# Altium PCB PCB_Gemas.PcbDoc (part 1 of 2)
Units mm, origin at the board's own origin, x right, y up, seen from the top; angles counter-clockwise.
Board outline 100 x 71 mm, 2 copper layers (Top Layer, Bottom Layer); 85 components, 61 nets, 758 pads, 66 vias.
Unrouted connection lines stored in the file: 1.
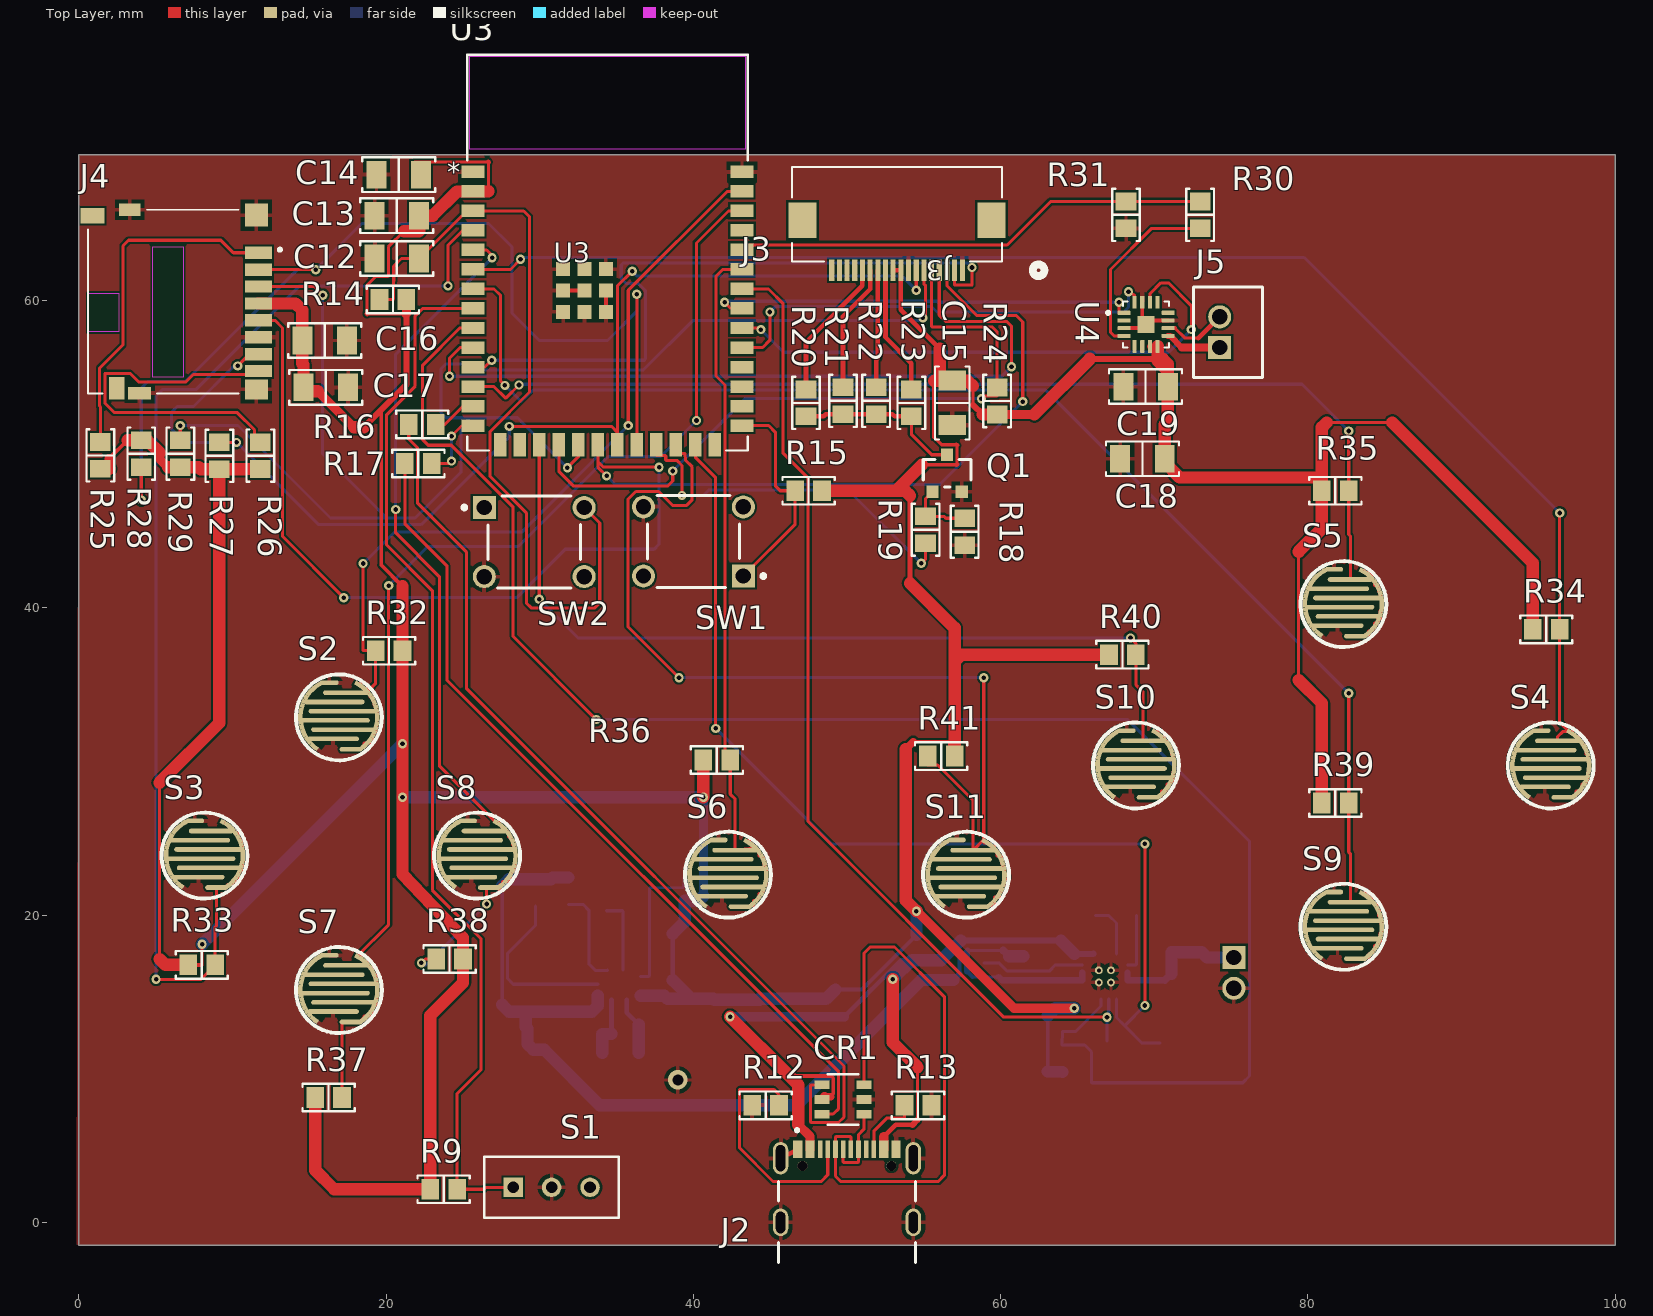
[diagram p0: Top Layer view]
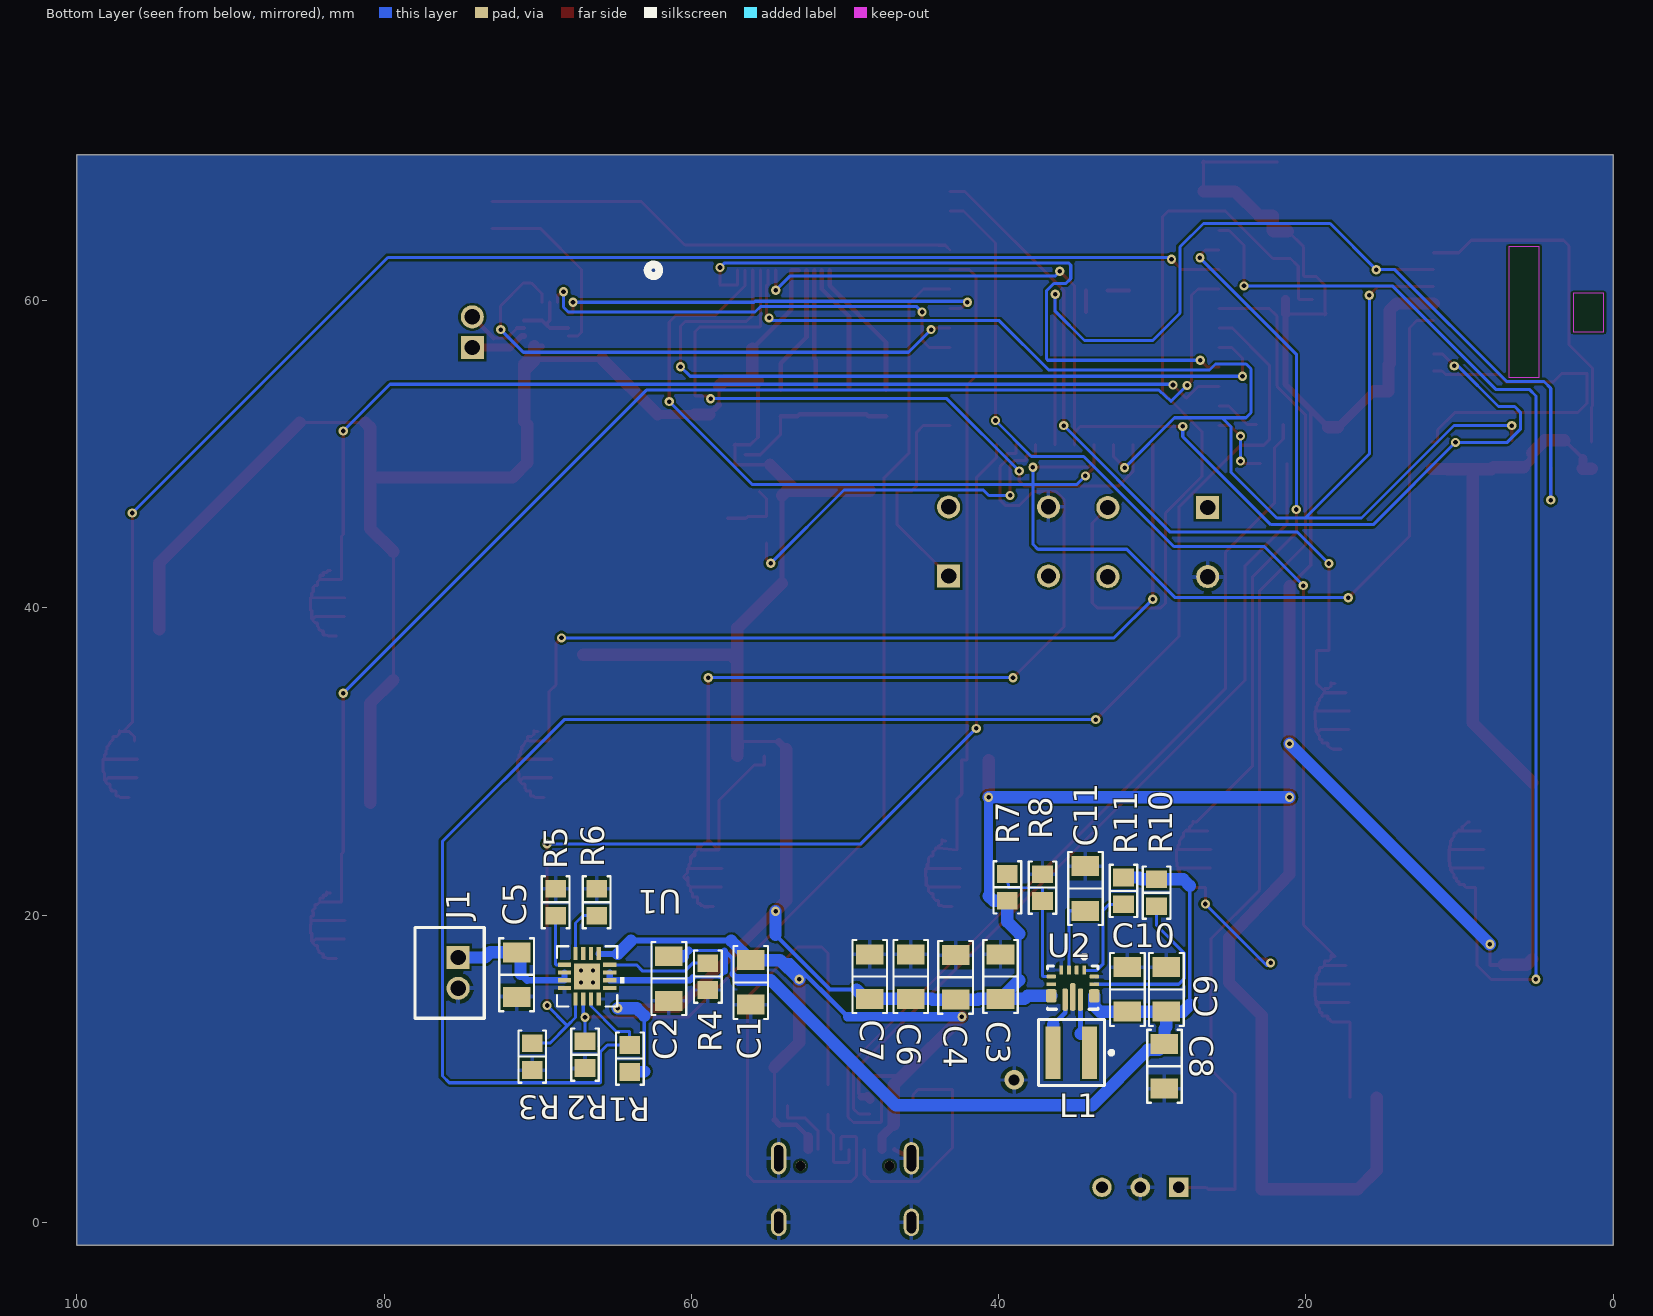
[diagram p1: Bottom Layer view, seen from below]
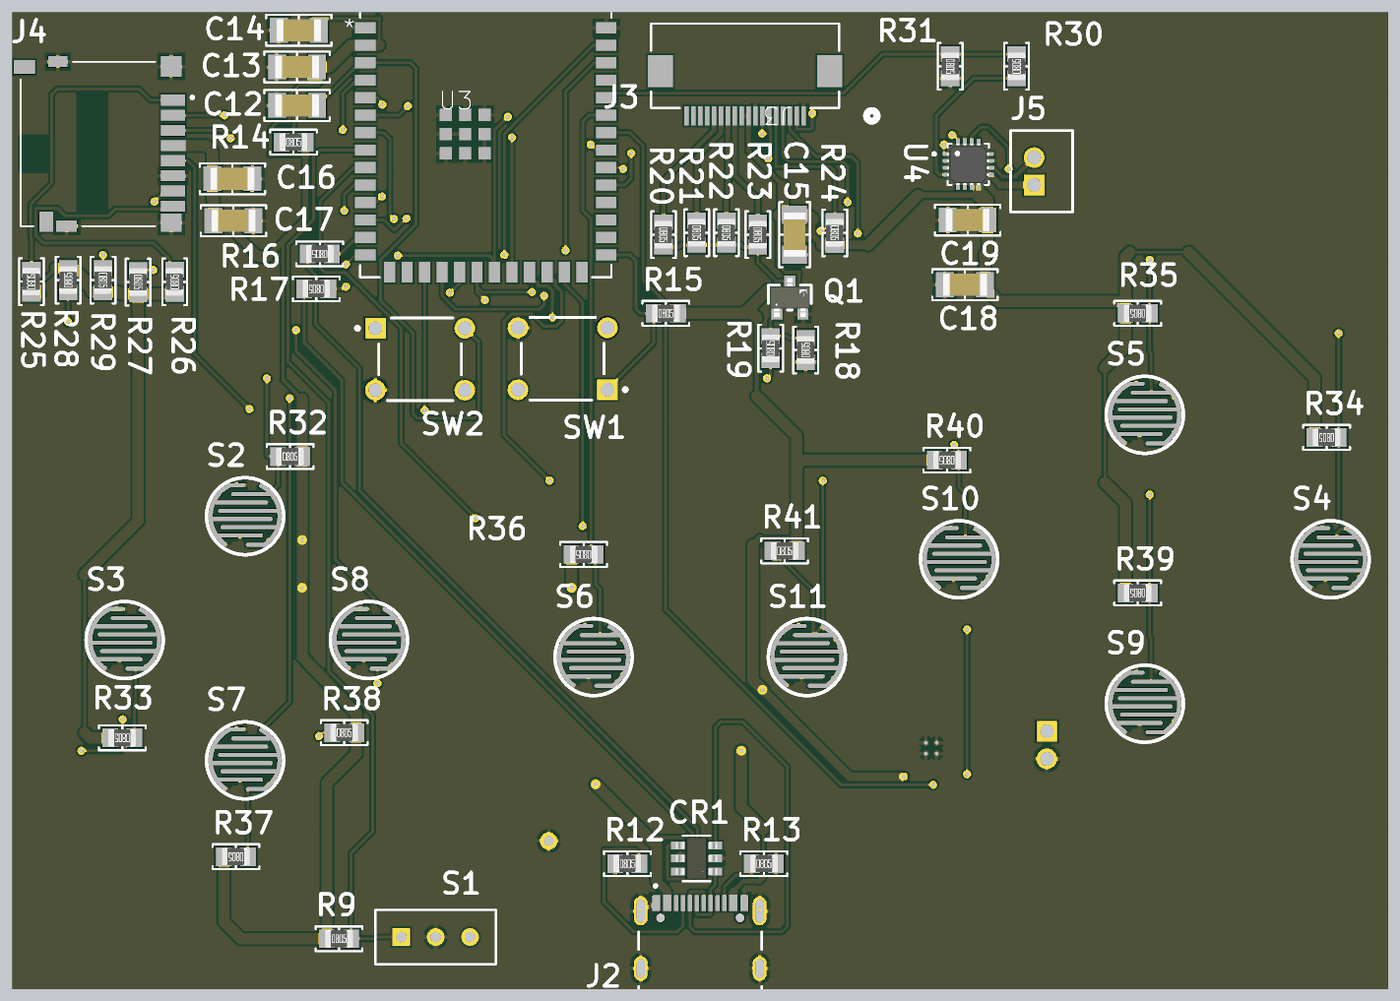
[diagram p2: 3D render of the assembled board from above, using the file's embedded part models]
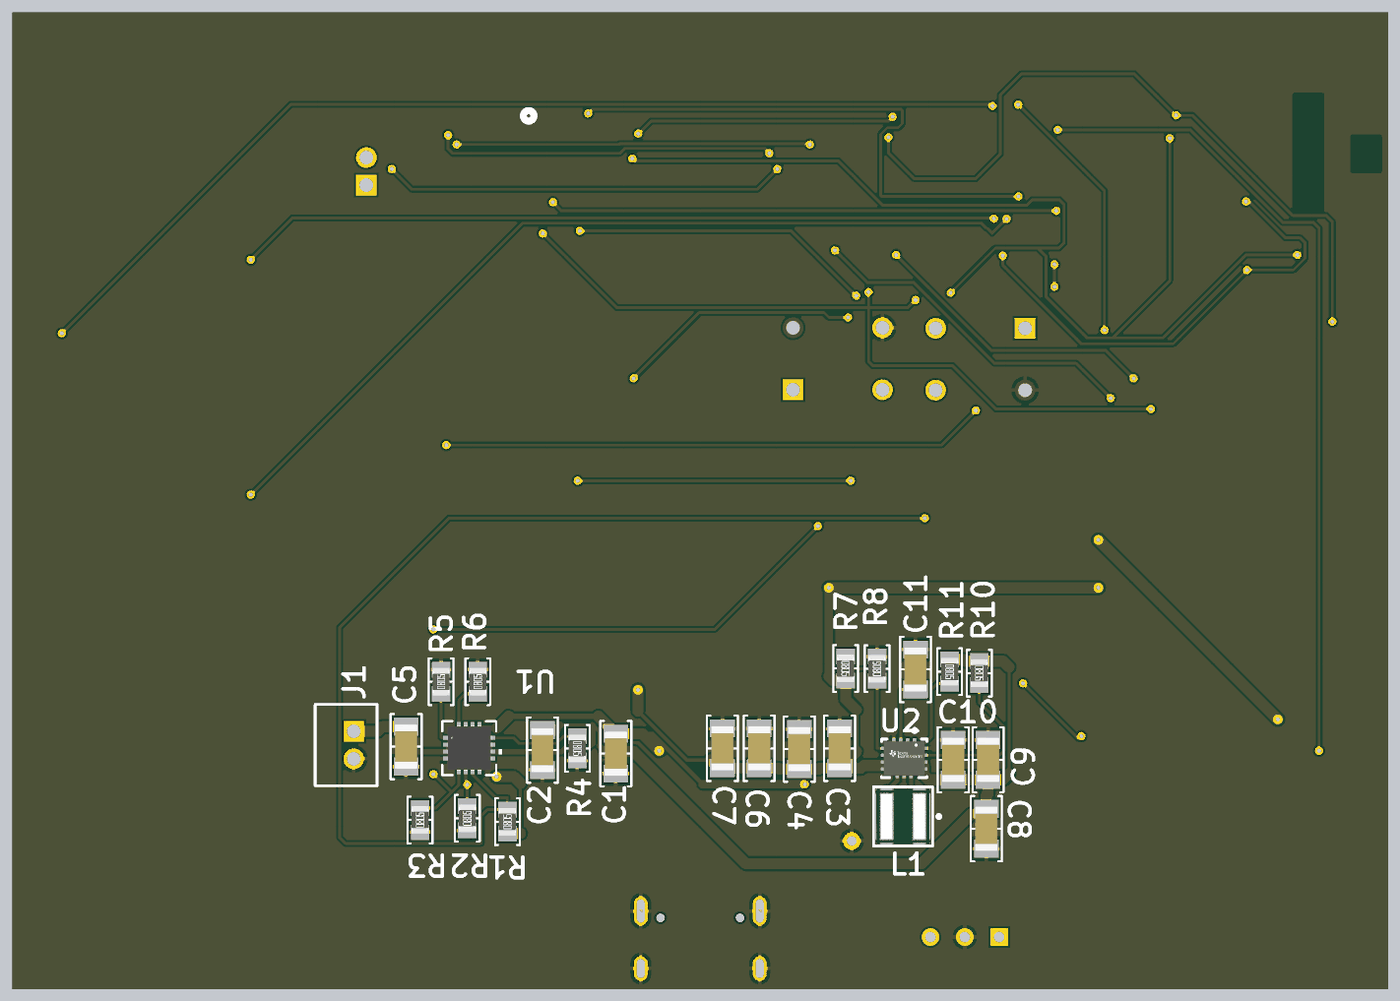
[diagram p3: 3D render of the assembled board from below, using the file's embedded part models]

## Layer stack, top to bottom
Top Solder: solder mask 0.0102, Solder Resist, Dk 3.5
Top Layer: signal copper 0.0356
Dielectric 1: dielectric 0.32, FR-4, Dk 4.8
Bottom Layer: signal copper 0.0356
Bottom Solder: solder mask 0.0102, Solder Resist, Dk 3.5

## Board outline
0,-1.5 0,69.5 100,69.5 100,-1.5

## Design rules (kind name [scope] priority, off if disabled: settings)
Clearance [All] p1: gap=0.15 ignorepadtopadclearanceinfootprint=FALSE
MinimumSolderMaskSliver [All] p1: minsoldermaskwidth=0.1
PolygonConnect [All] p1: connectstyle=Relief reliefconductorwidth=0.254 reliefentries=4 polygonreliefangle="90 Angle" airgapwidth=0.254
RoutingVias [All] p1: holewidth=0.3 width=0.6 viastyle="Through Hole" minholewidth=0.3 minwidth=0.6 maxholewidth=0.3 maxwidth=0.6
SilkToSolderMaskClearance [IsPad] p1: minsilkscreentomaskgap=0.15 clearancetoexposedcopper=TRUE
SolderMaskExpansion [All] p1: expansion=0.05 istentingtop=FALSE
SupplyNets "Schematic Supply Nets_4" [InNet('+3V3')] p1: voltage=0.000
SupplyNets "Schematic Supply Nets_3" [InNet('GND')] p2: voltage=0.000
SupplyNets "Schematic Supply Nets_2" [InNet('VBAT')] p3: voltage=0.000
SupplyNets "Schematic Supply Nets_1" [InNet('VSYS')] p4: voltage=0.000
SupplyNets "Schematic Supply Nets" [InNet('VBUS_V5')] p5: voltage=0.000
Width W_BACKLIGHT [InNetClass('BACKLIGHT')] p1: maxlimit=0.5 minlimit=0.15 preferedwidth=0.2
Width W_SPEAKER [InNetClass('SPEAKER')] p2: maxlimit=0.8 minlimit=0.254 preferedwidth=0.5
Width W_POWER [InNetClass('POWER') Or InNetClass('REG_SW')] p3: maxlimit=1.5 minlimit=0.254 preferedwidth=0.8
Width [All] p4: maxlimit=0.4 minlimit=0.15 preferedwidth=0.25
28 further rules are at their usual default settings.

## Classes and differential pairs
component class USB-C: CR1 J2 R12 R13
component class Pantalla_microSD: C15 C16 C17 J3 J4 Q1 R18 R19 R20 R21 R22 R23 R24 R25 R26 R27 R28 R29
component class ESP32: C12 C13 C14 R14 R15 R16 R17 SW1 SW2 U3
component class Controles: R32 R33 R34 R35 R36 R37 R38 R39 R40 R41 S2 S3 S4 S5 S6 S7 S8 S9 S10 S11
component class Audio: C18 C19 J5 R30 R31 U4
component class Alimentacion: C1 C2 C3 C4 C5 C6 C7 C8 C9 C10 C11 J1 L1 R1 R2 R3 R4 R5 R6 R7 R8 R9 R10 R11 S1 U1 U2

## Components (designator, comment, footprint, x,y, rotation, side; value= is the part's Value field where it differs from the comment)
C1 "Capacitor" "CAP 1206_3216" 56.134,15.621 r270 bottom value=1uF
C2 "Capacitor" "CAP 1206_3216" 61.468,15.875 r90 bottom value=10uF
C3 "22uF" "CAP 1206_3216" 39.878,16.002 r90 bottom
C4 "22uF" "CAP 1206_3216" 42.799,15.949 r90 bottom
C5 "Capacitor" "CAP 1206_3216" 71.374,16.129 r90 bottom value=10uF
C6 "22uF" "CAP 1206_3216" 45.72,16.002 r90 bottom
C7 "Capacitor" "CAP 1206_3216" 48.387,16.002 r90 bottom value=10uF
C8 "Capacitor" "CAP 1206_3216" 29.21,10.16 r90 bottom value=10uF
C9 "Capacitor" "CAP 1206_3216" 29.083,15.166 r270 bottom value=10uF
C10 "Capacitor" "CAP 1206_3216" 31.623,15.166 r270 bottom value=10uF
C11 "Capacitor" "CAP 1206_3216" 34.355,21.735 r270 bottom value=100nF
C12 "1 uF" "CAP 1206_3216" 20.701,62.738 r0 top
C13 "Capacitor" "CAP 1206_3216" 20.701,65.532 r0 top value=22uF
C14 "Capacitor" "CAP 1206_3216" 20.828,68.199 r180 top value=100nF
C15 "Capacitor" "CAP 1206_3216" 56.855,53.34 r90 top value=100nF
C16 "Capacitor" "CAP 1206_3216" 16.002,57.404 r180 top value=100nF
C17 "Capacitor" "CAP 1206_3216" 16.076,54.356 r180 top value=10uF
C18 "Capacitor" "CAP 1206_3216" 69.234,49.707 r0 top value=10uF
C19 "Capacitor" "CAP 1206_3216" 69.435,54.406 r0 top value=100nF
CR1 "USBLC6-2SC6" SOT23-6L_STM 49.732,8.001 r180 top
J1 "B2B-PH-K-S(LF)(SN)" JST-B2B-PH-K-S_V 75.734,16.24 r270 bottom
J2 "USB4105-GF-A" GCT_USB4105-GF-A 50,0 r0 top
J3 "FH12-18S-0.5SH(55)" CONN_FH12-18S-0.5SH-55_HIR 57.507,61.976 r180 top
J4 "DM3D-SF" HRS_DM3D-SF 11.684,59.917 r90 top
J5 "B2B-PH-K-S(LF)(SN)" JST-B2B-PH-K-S_V 74.811,57.946 r90 top
L1 "1.5uH" FP-XFL4020-MFG 35.264,11.049 r0 bottom
Q1 "AO3400A" FP-SOT23-MFG 56.515,48.768 r90 top
R1 "Resistor" "RES 0805_2012" 64.008,10.668 r90 bottom value="10 k"
R2 "Resistor" "RES 0805_2012" 66.929,10.922 r90 bottom value="10 k"
R3 "Resistor" "RES 0805_2012" 70.358,10.795 r90 bottom value="10 k"
R4 "Resistor" "RES 0805_2012" 58.928,16.002 r270 bottom value="3.48 k"
R5 "Resistor" "RES 0805_2012" 68.834,20.842 r90 bottom value="10 k"
R6 "Resistor" "RES 0805_2012" 66.167,20.842 r90 bottom value="1.78 k"
R7 "Resistor" "RES 0805_2012" 39.435,21.809 r270 bottom value="470 k"
R8 "Resistor" "RES 0805_2012" 37.149,21.795 r90 bottom value="150 k"
R9 "Resistor" "RES 0805_2012" 23.749,2.159 r0 top value=10k
R10 "Resistor" "RES 0805_2012" 29.718,21.463 r270 bottom value=10k
R11 "Resistor" "RES 0805_2012" 31.877,21.576 r270 bottom value=10k
R12 "Resistor" "RES 0805_2012" 44.704,7.62 r0 top value="5.1 k"
R13 "Resistor" "RES 0805_2012" 54.624,7.62 r0 top value="5.1 k"
R14 "10 k" "RES 0805_2012" 20.447,60.071 r0 top value="10 K"
R15 "10 k" "RES 0805_2012" 47.498,47.625 r0 top value="10 K"
R16 "Resistor" "RES 0805_2012" 22.352,51.943 r180 top value=22
R17 "Resistor" "RES 0805_2012" 22.098,49.403 r180 top value=22
R18 "Resistor" "RES 0805_2012" 57.658,44.958 r90 top value="100 k"
R19 "Resistor" "RES 0805_2012" 55.118,45.085 r90 top value=100
R20 "Resistor" "RES 0805_2012" 47.33,53.34 r270 top value="1 k"
R21 "Resistor" "RES 0805_2012" 49.743,53.481 r270 top value="1 k"
R22 "Resistor" "RES 0805_2012" 51.902,53.481 r270 top value="1 k"
R23 "Resistor" "RES 0805_2012" 54.188,53.34 r270 top value="1 k"
R24 "Resistor" "RES 0805_2012" 59.776,53.467 r270 top value="10 k"
R25 "Resistor" "RES 0805_2012" 1.397,49.925 r90 top value="10 k"
R26 "Resistor" "RES 0805_2012" 11.811,49.911 r90 top value="10 k"
R27 "Resistor" "RES 0805_2012" 9.144,49.897 r270 top value="10 k"
R28 "Resistor" "RES 0805_2012" 4.064,50.038 r90 top value="10 k"
R29 "Resistor" "RES 0805_2012" 6.604,50.038 r270 top value="10 k"
R30 "Resistor" "RES 0805_2012" 72.991,65.582 r90 top value="634 K"
R31 "Resistor" "RES 0805_2012" 68.165,65.582 r270 top value=10k
R32 "Resistor" "RES 0805_2012" 20.193,37.211 r0 top value="10 k"
R33 "Resistor" "RES 0805_2012" 8.001,16.764 r180 top value="10 k"
R34 "Resistor" "RES 0805_2012" 95.518,38.608 r180 top value="10 k"
R35 "Resistor" "RES 0805_2012" 81.788,47.625 r180 top value="10 k"
R36 "Resistor" "RES 0805_2012" 41.529,30.099 r180 top value="10 k"
R37 "Resistor" "RES 0805_2012" 16.256,8.128 r180 top value="10 k"
R38 "Resistor" "RES 0805_2012" 24.13,17.145 r0 top value="10 k"
R39 "Resistor" "RES 0805_2012" 81.788,27.305 r180 top value="10 k"
R40 "Resistor" "RES 0805_2012" 67.931,36.957 r180 top value="10 k"
R41 "Resistor" "RES 0805_2012" 56.134,30.353 r0 top value="10 k"
S1 "Single-Pole, Double-Throw Switch" 1P2T_SS-12D00_CNK 28.274,2.286 r90 top
S2 "Single-Pole, Single-Throw Switch" SNES_BTN_soft+mech_5mm_0.3_0.3 16.925,32.877 r0 top
S3 "Single-Pole, Single-Throw Switch" SNES_BTN_soft+mech_5mm_0.3_0.3 8.175,23.877 r0 top
S4 "Single-Pole, Single-Throw Switch" SNES_BTN_soft+mech_5mm_0.3_0.3 95.81,29.746 r0 top
S5 "Single-Pole, Single-Throw Switch" SNES_BTN_soft+mech_5mm_0.3_0.3 82.31,40.246 r0 top
S6 "Single-Pole, Single-Throw Switch" SNES_BTN_soft+mech_5mm_0.3_0.3 42.25,22.634 r0 top
S7 "Single-Pole, Single-Throw Switch" SNES_BTN_soft+mech_5mm_0.3_0.3 16.925,15.127 r0 top
S8 "Single-Pole, Single-Throw Switch" SNES_BTN_soft+mech_5mm_0.3_0.3 25.925,23.877 r0 top
S9 "Single-Pole, Single-Throw Switch" SNES_BTN_soft+mech_5mm_0.3_0.3 82.31,19.246 r0 top
S10 "Single-Pole, Single-Throw Switch" SNES_BTN_soft+mech_5mm_0.3_0.3 68.81,29.746 r0 top
S11 "Single-Pole, Single-Throw Switch" SNES_BTN_soft+mech_5mm_0.3_0.3 57.75,22.634 r0 top
SW1 "B3F-1000" OMRON-B3F-1000-4_V 40.005,44.323 r180 top
SW2 "B3F-1000" OMRON-B3F-1000-4_V 29.643,44.287 r0 top
U1 "BQ24074RGTR" RGT16_1P7X1P7 66.789,16.015 r180 bottom
U2 "TPS63070RNMR" FP-RNM0015A-MFG 35.176,15.277 r270 bottom
U3 "ESP32-S3-WROOM-1-N16R8" ESP32-S3-WROOM-1_EXP 34.417,63.119 r0 top
U4 "MAX98357AETE+T" QFN50P300X300X80-17N 69.473,58.458 r0 top

## Footprints (in the part's own frame and the unit in brackets; to place one, negate y for a bottom-side part, rotate by r counter-clockwise, add the part's x,y. Pads: shape width x height; smd on the part's side, far side on the other; paste and mask are expansions set on the pad)
1P2T_SS-12D00_CNK [mil]
  rect 50x50 hole 30 paste-99999 mask+0: 1(0,0)
  round 50 hole 30 paste-99999 mask+0: 2(0,-98.42) 3(0,-196.85)
  silkscreen extent -78,-271 78,74
"CAP 1206_3216" [mm] "Chip Capacitor, 2-Leads, Body 3.25x1.60mm, IPC Medium Density"
  rect 1.3x1.8 smd: 1(-1.45,0) 2(1.45,0)
  silkscreen extent -2.37,-1.13 2.38,1.13, body extent -1.6,-0.81 1.6,0.81, height 1.62
CONN_FH12-18S-0.5SH-55_HIR [mil]
  rect 13x55 smd paste+0 mask+0: 1(0,0) 2(19.68,0) 3(39.37,0) 4(59.05,0) 5(78.74,0) 6(98.42,0) 7(118.11,0) 8(137.79,0) 9(157.48,0) 10(177.17,0) 11(196.85,0) 12(216.54,0) 13(236.22,0) 14(255.91,0) 15(275.59,0) 16(295.28,0) 17(314.96,0) 18(334.65,0)
  rect 71x91 smd paste+0 mask+0: 19(-74.8,-127.95) 20(409.45,-127.95)
  silkscreen extent -210,-264 436,15
ESP32-S3-WROOM-1_EXP [mil]
  rect 59x32 smd paste+0 mask+0: 1(-344.49,207.09) 2(-344.49,157.09) 3(-344.49,107.09) 4(-344.49,57.09) 5(-344.49,7.09) 6(-344.49,-42.91) 7(-344.49,-92.91) 8(-344.49,-142.91) 9(-344.49,-192.91) 10(-344.49,-242.91) 11(-344.49,-292.91) 12(-344.49,-342.91) 13(-344.49,-392.91) 14(-344.49,-442.91) 27(344.49,-442.91) 28(344.49,-392.91) 29(344.49,-342.91) 30(344.49,-292.91) 31(344.49,-242.91) 32(344.49,-192.91) 33(344.49,-142.91) 34(344.49,-92.91) 35(344.49,-42.91) 36(344.49,7.09) 37(344.49,57.09) 38(344.49,107.09) 39(344.49,157.09) 40(344.49,207.09)
  rect 32x59 smd paste+0 mask+0: 15(-275,-492.13) 16(-225,-492.13) 17(-175,-492.13) 18(-125,-492.13) 19(-75,-492.13) 20(-25,-492.13) 21(25,-492.13) 22(75,-492.13) 23(125,-492.13) 24(175,-492.13) 25(225,-492.13) 26(275,-492.13)
  rect 35x35 smd paste+0 mask+0: 41(-59.06,-96.85) 42(-114.17,-41.73) 43(-114.17,-96.85) 44(-114.17,-151.97) 45(-59.06,-151.97) 46(-3.94,-151.97) 47(-3.94,-96.85) 48(-3.94,-41.73) 49(-59.06,-41.73)
  Top Layer keep-out region: 354.5,502 -354.5,502 -354.5,266 354.5,266
  silkscreen extent -360,-507 360,507
FP-RNM0015A-MFG [mm]
  rrect40% 0.6x0.25 smd paste+0 mask-1000: 1(-1.15,0.75) 2(-1.15,0.25) 3(-1.15,-0.25) 4(-1.15,-0.75)
  rrect40% 0.25x0.6 smd paste+0 mask-1000: 5(-0.725,-1.4) 6(-0.225,-1.4) 14(-0.225,1.4) 15(-0.725,1.4)
  rrect29% 0.85x0.7 smd paste-1000 mask-1000: 7-8(0.525,-1.4) 12-13(0.525,1.4)
  rrect57% 1.45x0.35 smd paste-1000 mask-1000: 9(0.775,-0.5) 11(0.775,0.5)
  rrect57% 1.8x0.35 smd paste-1000 mask-1000: 10(0.6,0)
  silkscreen extent -2.15,-1.65 1.4,1.65, body extent -1.25,-1.5 1.25,1.5, height 1
FP-SOT23-MFG [mm]
  rect 0.8x0.8 smd paste+0 mask+0: 1(-1.2,0.95) 2(-1.2,-0.95) 3(1.2,0)
  silkscreen extent -0.9,-1.55 0.9,1.55, body extent -1.41,-1.45 1.41,1.45, height 1.25
FP-XFL4020-MFG [mm]
  rect 0.98x3.4 smd paste+0 mask+0: 1(-1.185,0) 2(1.185,0)
  silkscreen extent -2.72,-2.15 2.15,2.15, body extent -2,-2 2,2, height 2.23
GCT_USB4105-GF-A [mm]
  rect 0.6x1.15 smd mask+0.05: A1_B12(-3.2,4.755) A4_B9(-2.4,4.755) B1_A12(3.2,4.755) B4_A9(2.4,4.755)
  rect 0.3x1.15 smd mask+0.05: A5(-1.25,4.755) A6(-0.25,4.755) A7(0.25,4.755) A8(1.25,4.755) B5(1.75,4.755) B6(0.75,4.755) B7(-0.75,4.755) B8(-1.75,4.755)
  oval 1x2.1 hole 0.6 slot 1.7 at 90 deg: SH1(-4.32,4.18) SH2(4.32,4.18)
  oval 1x1.8 hole 0.6 slot 1.4 at 90 deg: SH3(-4.32,0) SH4(4.32,0)
  round 0.65 hole 0.65 unplated: ""(-2.89,3.68) ""(2.89,3.68)
  silkscreen extent -4.47,-2.6 4.47,6.1
HRS_DM3D-SF [mm]
  rect 0.8x1.75 smd: 1(3.2,0) 2(2.1,0) 3(1,0) 4(-0.1,0) 5(-1.2,0) 6(-2.3,0) 7(-3.4,0) 8(-4.5,0)
  rect 1.3x1.5 smd: S1(-5.7,0.125)
  rect 1.5x1.5 smd: S2(5.65,0.125)
  rect 0.8x1.5 smd: S3(-5.95,7.725)
  rect 0.8x1.4 smd: S4(6,8.375)
  rect 1x1.55 smd: SW-A(5.6,10.8)
  rect 1.45x1 smd: SW-B(-5.625,9.225)
  Keep-Out Layer region: 0.55,9.075 -1.95,9.075 -1.95,11.075 0.55,11.075
  Keep-Out Layer region: 3.6,4.875 -4.9,4.875 -4.9,6.875 3.6,6.875
  Keep-Out Layer region: 3.6,4.875 -4.9,4.875 -4.9,6.875 3.6,6.875
  Keep-Out Layer region: 0.55,9.075 -1.95,9.075 -1.95,11.075 0.55,11.075
  silkscreen extent -5.95,-1.5 6,11.08
JST-B2B-PH-K-S_V [mm] "Connector, 2-Leads, Body 5.9x4.5mm, Pitch 2mm"
  rect 1.5x1.5 hole 1: 1(-1,0.55)
  round 1.5 hole 1: 2(1,0.55)
  silkscreen extent -2.95,-2.25 2.95,2.25, body extent -2.95,-2.25 2.95,2.25, height 6
OMRON-B3F-1000-4_V [mm] "TH, 4-Leads, Body 6x6mm"
  rect 1.5x1.5 hole 1 paste-2539.97: 1(-3.25,2.25)
  round 1.5 hole 1 paste-2539.97: 2(3.25,2.25) 4(3.25,-2.25)
  round 1.5 hole 1 paste-2539.97 mask+0.102: 3(-3.25,-2.25)
  silkscreen extent -4.68,-3 3,3, body extent -3,-3 3,3, height 4.5
QFN50P300X300X80-17N [mm]
  rrect25% 0.84x0.27 smd: 1(-1.435,0.75) 2(-1.435,0.25) 3(-1.435,-0.25) 4(-1.435,-0.75) 9(1.435,-0.75) 10(1.435,-0.25) 11(1.435,0.25) 12(1.435,0.75)
  rrect25% 0.27x0.84 smd: 5(-0.75,-1.435) 6(-0.25,-1.435) 7(0.25,-1.435) 8(0.75,-1.435) 13(0.75,1.435) 14(0.25,1.435) 15(-0.25,1.435) 16(-0.75,1.435)
  rect 1.1x1.1 smd paste-0.2: 17(0,0)
  silkscreen extent -2.57,-1.5 1.5,1.5, body extent -1.5,-1.5 1.5,1.5, height 0.9
"RES 0805_2012" [mm] "Chip Resistor, 2-Leads, Body 2.00x1.25mm, IPC Medium Density"
  rect 1.15x1.35 smd: 1(-0.875,0) 2(0.875,0)
  silkscreen extent -1.7,-0.9 1.7,0.9, body extent -1,-0.62 1,0.63, height 0.6
RGT16_1P7X1P7 [mm]
  rect 0.85x0.28 smd paste+0 mask+0: 1(-1.475,0.75) 2(-1.475,0.25) 3(-1.475,-0.25) 4(-1.475,-0.75) 9(1.475,-0.75) 10(1.475,-0.25) 11(1.475,0.25) 12(1.475,0.75)
  rect 0.28x0.85 smd paste+0 mask+0: 5(-0.75,-1.475) 6(-0.25,-1.475) 7(0.25,-1.475) 8(0.75,-1.475) 13(0.75,1.475) 14(0.25,1.475) 15(-0.25,1.475) 16(-0.75,1.475)
  rect 1.7x1.7 smd paste-0.85 mask-0.838: 17(0,0)
  round 0.508 hole 0.254 paste-2539.97 mask-0.254: V(-0.394,-0.394) V(-0.394,0.394) V(0.394,-0.394) V(0.394,0.394)
  silkscreen extent -1.96,-1.96 2.41,1.96, body extent -1.63,-1.63 1.63,1.63, height 1
SNES_BTN_soft+mech_5mm_0.3_0.3 [mm]
  rect 0.3x0.3 smd rot 1.24: 1(-2.499,-0.054)
  rect 0.3x0.3 smd rot 174.75: 1(-2.49,0.229)
  rect 0.3x0.3 smd rot 7.73: 1(-2.477,-0.336)
  rect 0.3x0.3 smd rot 168.27: 1(-2.448,0.508)
  rect 0.3x0.3 smd rot 14.21: 1(-2.423,-0.614)
  rect 0.3x0.3 smd rot 161.78: 1(-2.375,0.782)
  rect 0.3x0.3 smd rot 20.7: 1(-2.339,-0.884)
  rect 0.3x0.3 smd rot 155.29: 1(-2.271,1.045)
  rect 0.3x0.3 smd rot 27.18: 1(-2.224,-1.142)
  rect 0.3x0.3 smd rot 148.81: 1(-2.139,1.295)
  rect 0.3x0.3 smd rot 33.67: 1(-2.081,-1.386)
  rect 0.3x0.3 smd rot 142.32: 1(-1.979,1.528)
  rect 0.3x0.3 smd rot 40.16: 1(-1.911,-1.612)
  rect 0.3x0.3 smd rot 135.84: 1(-1.793,1.742)
  rect 0.3x0.3 smd rot 46.64: 1(-1.716,-1.818)
  rect 0.3x0.3 smd rot 129.35: 1(-1.585,1.933)
  rect 0.3x0.3 smd rot 53.13: 1(-1.5,-2)
  rect 0.3x0.3 smd rot 122.86: 1(-1.357,2.1)
  rect 0.3x0.3 smd rot 118.36: 1(-1.187,2.2)
  rrect100% 1.187x0.3 smd: 1(-0.61,2.26)
  rrect100% 3.377x0.3 smd: 1(-0.383,-1.4)
  rrect100% 3.968x0.3 smd: 1(-0.308,1)
  rrect100% 4.506x0.3 smd: 1(-0.239,-0.2)
  rrect100% 4.434x0.3 smd: 2(0.251,0.4)
  rrect100% 4.169x0.3 smd: 2(0.284,-0.8)
  rrect100% 2.938x0.3 smd: 2(0.452,1.6)
  rrect100% 1.5x0.3 smd: 2(0.8,-2.08)
  rect 0.3x0.3 smd rot 61.64: 2(1.187,2.2)
  rect 0.3x0.3 smd rot 55.16: 2(1.428,2.052)
  rect 0.3x0.3 smd rot 126.87: 2(1.5,-2)
  rect 0.3x0.3 smd rot 48.67: 2(1.651,1.877)
  rect 0.3x0.3 smd rot 131.38: 2(1.652,-1.876)
  rect 0.3x0.3 smd rot 42.18: 2(1.852,1.679)
  rect 0.3x0.3 smd rot 137.86: 2(1.854,-1.677)
  rect 0.3x0.3 smd rot 35.7: 2(2.03,1.459)
  rect 0.3x0.3 smd rot 144.35: 2(2.031,-1.457)
  rect 0.3x0.3 smd rot 29.21: 2(2.182,1.22)
  rect 0.3x0.3 smd rot 150.83: 2(2.183,-1.218)
  rect 0.3x0.3 smd rot 22.72: 2(2.306,0.966)
  rect 0.3x0.3 smd rot 157.32: 2(2.307,-0.964)
  rect 0.3x0.3 smd rot 16.24: 2(2.4,0.699)
  rect 0.3x0.3 smd rot 163.81: 2(2.401,-0.697)
  rect 0.3x0.3 smd rot 9.75: 2(2.464,0.423)
  rect 0.3x0.3 smd rot 170.29: 2(2.464,-0.422)
  rect 0.3x0.3 smd rot 3.27: 2(2.496,0.142)
  rect 0.3x0.3 smd rot 176.78: 2(2.496,-0.14)
  silkscreen extent -2.8,-2.8 2.8,2.8
SOT23-6L_STM [mil]
  rect 38.5x22 smd paste+0 mask+0: 1(-53.75,37.4) 2(-53.75,0) 3(-53.75,-37.4) 4(53.75,-37.4) 5(53.75,0) 6(53.75,37.4)
  silkscreen extent -39,-65 40,65, body extent -59,-60 59,60, height 57

## Part data
C3 C4 C6: library part Capacitor, "22F", SimulationGenericComponent=True
C12: library part Capacitor, "Capacitor", SimulationGenericComponent=True
CR1: "ESD Protection for USB 2.0 High Speed", Manufacturer_Name=STMicroelectronics, Copyright="Copyright (C) 2025 Ultra Librarian. All rights reserved.", Manufacturer_Part_Number=USBLC6-2SC6, RefDes=RefDes, Type=Type
J1 J5: library part CMP-2000-05162-1, "Male Header, Pitch 2 mm, 1 x 2 Position, Height 6 mm, Tail Length 3.4 mm, -25 to 85 degC, RoHS, Bulk", Manufacturer=JST, Datasheet URL=http://datasheet.octopart.com/B2B-PH-K-S%28LF%29%28SN%29-JST-datasheet-8324864.pdf, Datasheet Version=Nov-08, Manufacturer URL=http://www.jst.com/home2.html, No of Positions=2, Pitch=2mm, Style/Orientation=StraightHeader/Plug, Termination=Crimp, Type=ShroudedHeader
J2: Package=None, Availability=Unavailable, MF="{'manufacturer': u'GCT'}", MP=USB4105-GF-A, Price=None
J3: library part FH12-18S-0.5SH55, "Description", Manufacturer_Name=Hirose, Copyright="Copyright (C) 2026 Ultra Librarian. All rights reserved.", Manufacturer_Part_Number=FH12-18S-0.5SH(55), RefDes=RefDes, Type=Type
J4: "10 _8 + 2_ Position Card Connector Secure Digital - microSDâ„¢ Surface Mount, Right Angle Gold", Package=None, Availability=Unavailable, MF="Hirose Electric", MP=DM3D-SF, Price=None, SnapEDA_Link=https://www.snapeda.com/parts/DM3D-SF/Hirose%20Electric%20Co%20Ltd/view-part/250106/?ref=snap
L1: library part CMP-11268-000104-1, "Inductor Power Shielded Wirewound 1.5uH 20% 100KHz 9.1A 15.8mOhm DCR 1515 Automotive Embossed Plastic T/R", Case/Package=SMD/SMT, DC Resistance (DCR)=15.8mR, Inductance Tolerance=20%, Max DC Current=9.1A, Max Operating Temperature=125°C, Min Operating Temperature=-40°C, Saturation Current=4.1A, Self Resonant Frequency=59MHz, Test Frequency=100kHz, Core Material=Composite, Height=2.1mm, Inductance=1.5uH, Lead Free="Contains Lead", Length=4.3mm, Mount="Surface Mount", Packaging="Tape and Reel", REACH SVHC="No SVHC", RMS Current (Irms)=9.1A, RoHS Compliant=Yes, Series=XFL4020, Shielding=Shielded, Termination=SMD/SMT, Tolerance=20%, Width=4.3mm
Q1: library part CMP-83955-000006-1, "MOSFET N-CH 30V 5.7A SOT23", Case/Package=SOT-23, Continuous Drain Current (ID)=5.7A, Drain to Source Voltage (Vdss)=30V, Gate to Source Voltage (Vgs)=12V, Input Capacitance=630pF, Max Operating Temperature=150°C, Max Power Dissipation=1.4W, Min Operating Temperature=-55°C, Lead Free="Lead Free", Mount="Surface Mount", Number of Elements=1, Number of Pins=3, Packaging="Tape and Reel", Power Dissipation=1.4W, Radiation Hardening=No, Rds On Max=26.5mR
R14 R15: library part Resistor, "Resistor", SimulationGenericComponent=True, TC1=0, TC2=0
S1: library part "SPDT SW", nodeUP_closed=1, Rclosed=1m, Ropen=1Meg, SimulationGenericComponent=True
S2 S3 S4 S5 S6 S7 S8 S9 S10 S11: library part "SPST SW", closed=0, Rclosed=1m, Ropen=1Meg, SimulationGenericComponent=True
SW1 SW2: library part CMP-1677-00002-1, "Tactile Switch, SPST-NO, 0.05 A, 5 to 24 V, -25 to 70 degC, 4-Pin THD, RoHS, Bulk", Capacitance="-45 f", Current Rating="1.5 A", Max Operating Temperature="70 degC", Min Operating Temperature="-40 degC", Package Quantity=1080, Voltage Rating="150 V", ComponentLink1Description="Manufacturer URL", ComponentLink1URL=http://www.omron.com/, ComponentLink2Description=Datasheet, ComponentLink2URL=http://www.omron.com/ecb/products/pdf/en-b3f.pdf, Contact Material=Brass, Contact Plating=Gold, DatasheetVersion=Jan-15, Gender=Female, Height="14.99 mm", Lead Pitch="1.27 mm", Length="18.34 mm", Mount="Through Hole", PackageDescription="4-Pin Through Hole Device, Body 6 x 6 mm", PackageReference=B3F-1000, Packaging=Tray, Pins=8, Radiation Hardening=No, RoHSCompliant=true, Shielding=Shielded, Width="25.4 mm"
U1: "Standalone 1-cell 1.5-A linear battery charger, Power Path, 4.2-V VBAT, 10.5-V OVP and 4.4-V VOUT 16-VQFN -40 to 85", Manufacturer_Name="Texas Instruments", Copyright="Copyright (C) 2026 Ultra Librarian. All rights reserved.", Manufacturer_Part_Number=BQ24074RGTR, RefDes=RefDes, Type=Type
U2: library part CMP-04918-000409-1, "IC REG BCK BST ADJ 3.6A 15VQFN", Case/Package=VQFN, Max Input Voltage=16V, Max Operating Temperature=125°C, Max Output Voltage=9V, Min Input Voltage=2V, Min Operating Temperature=-40°C, Min Output Voltage=2.5V, Output Current=2A, Quiescent Current=50uA, Switching Frequency=2.4MHz, Lead Free="Lead Free", Mount="Surface Mount", Number of Outputs=1, Number of Pins=15, Output Configuration=Positive, Output Type=Adjustable, Packaging="Tape and Reel", RoHS Compliant=Yes, Synchronous Rectifier=Yes, Topology=Buck-Boost
U3: "Description", Manufacturer_Name="Espressif Systems", Copyright="Copyright (C) 2026 Ultra Librarian. All rights reserved.", Manufacturer_Part_Number=ESP32-S3-WROOM-1-N16R8, RefDes=RefDes, Type=Type
U4: "Tiny, Low-Cost, PCM Class D Amplifier with Class AB Performance", Package="TQFN-16 Maxim", Check_prices=https://www.snapeda.com/parts/MAX98357AETE+T/Analog+Devices/view-part/?ref=eda, MF="Analog Devices", MP=MAX98357AETE+T, SnapEDA_Link=https://www.snapeda.com/parts/MAX98357AETE+T/Analog+Devices/view-part/?ref=snap
C1 C2 C5 C7 C8 C9 C10 C11 C13 C14 C15 C16 C17 C18 C19: SimulationGenericComponent=True
R1 R2 R3 R4 R5 R6 R7 R8 R9 R10 R11 R12 R13 R16 R17 R18 R19 R20 R21 R22 R23 R24 R25 R26 R27 R28 R29 R30 R31 R32 R33 R34 R35 R36 R37 R38 R39 R40 R41: SimulationGenericComponent=True, TC1=0, TC2=0

## Via types
v1: diameter 0.6, hole 0.3, Top Layer to Bottom Layer, 65 vias
v2: diameter 1.27, hole 0.711, Top Layer to Bottom Layer, 1 vias

## Nets (pads, with @x,y where several pads share a name; then routed paths per layer and width w, separated by ;. In a path a pad name is that pad's centre, name@x,y a point inside that pad or via, vN(x,y) a via of type N, cw(c..) or ccw(c..) an arc to the next point about the centre after c; other vN are vias at no path point)
+3V3: C3.1 C4.1 C6.1 C7.1 C13.2 C14.1 C15.2 C16.2 C17.2 C18.2 C19.2 J3.9 J3.10 J4.4 R1.1 R7.2 R9.1 R14.2 R15.2 R24.2 R25.1 R26.1 R27.2 R28.2 R29.2 R32.2 R33.2 R34.2 R35.2 R36.2 R37.2 R38.2 R39.2 R40.2 R41.2 U2.7-8 U3.2 U4.7 U4.8 | length 414.1
  Top Layer w0.2: 5.258,17.145 5.258,28.626 ; 8.001,16.764 8.026,16.789 v1(8.026,18.11) ; 18.745,59.157 18.745,60.985 19.329,61.57 20.126,61.57 20.151,61.595 20.151,63.5 21.163,64.512 ; 18.771,59.131 21.297,59.131 ; 19.685,42.785 19.685,52.897 ; C14.1@21.844,69.037 26.645,69.037 ; 26.67,67.134 26.67,69.012 ; 54.318,31.293 56.984,31.293 ; 54.889,49.318 57.131,49.318 ; 55.668,51.117 56.168,50.618 57.125,50.618 ; 57.165,49.352 57.165,50.578 ; 58.2,53.218 58.2,54.438 ; 79.4,35.306 79.4,43.663 ; 81.23,52.07 85.496,52.07
  Top Layer w0.254: 1.972,49.711 3.174,50.913 ; R33.2 8.001,16.764 ; 19.685,42.785 21.068,41.402 ; 55.668,51.117 55.668,54.762
  Top Layer w0.3: 18.745,59.157 18.771,59.131 ; 26.645,69.037 26.67,69.012 ; J3.10 J3.9 53.507,59.409 56.036,56.879 ; 54.102,41.605 54.102,47.307 ; 57.125,50.618 57.165,50.578 ; 57.131,49.318 57.165,49.352
  Top Layer w0.4: 18.541,51.752 19.685,52.897 21.322,54.534 21.322,59.157 ; 58.2,53.218 58.826,52.592 ; 65.811,56.21 70.223,56.21 ; U4.7 U4.8
  Top Layer w0.5: 53.823,30.797 54.318,31.293
  Top Layer w0.6: R25.1@1.972,49.05 1.972,49.711 ; 5.277,50.081 5.277,49.686 5.801,49.163 ; 15.556,54.102 17.906,51.752 ; 21.297,59.131 21.322,59.157 R14.2 ; v1@54.559,20.256 60.871,13.945 v1(64.795,13.945) ; R24.2 62.193,52.592
  Top Layer w0.8: R25.1 R25.1@1.972,49.05 ; 3.174,50.913 R28.2 4.445,50.913 5.277,50.081 ; 5.258,17.145 5.639,16.764 R33.2 ; 5.258,28.626 9.144,32.512 R27.2 ; 5.801,49.163 R29.2 7.798,49.163 7.939,49.022 R27.2 ; J4.4 14.108,59.817 14.552,59.372 C16.2 14.552,55.903 14.626,55.829 C17.2 14.626,54.102 15.556,54.102 ; R26.1 10.822,49.036 10.808,49.022 R27.2 ; R37.2 15.381,3.404 16.626,2.159 R9.1 22.874,13.464 25.005,15.595 R38.2 25.005,18.531 21.068,22.671 v1(21.068,27.675) v1(21.068,31.152) R32.2 21.068,41.402 ; 17.906,51.752 18.541,51.752 ; 21.163,64.512 22.123,64.512 22.151,64.54 C13.2 23.038,65.532 24.615,67.109 U3.2 26.645,67.109 26.67,67.134 ; v1(40.654,27.675) R36.2 ; R15.2 53.196,47.625 ; 53.823,30.797 53.823,20.955 v1(54.521,20.256) v1@54.559,20.256 ; 54.102,41.605 57.009,38.698 57.009,36.512 ; 54.102,47.307 53.785,47.625 53.196,47.625 ; 54.889,49.318 53.196,47.625 ; 55.668,54.762 55.696,54.79 C15.2@56.036,54.79 ; 56.036,56.879 C15.2@56.036,54.79 ; 56.984,31.293 R41.2 57.009,36.512 ; 58.2,54.438 57.848,54.79 C15.2 C15.2@56.036,54.79 ; 58.826,52.592 R24.2 ; 62.193,52.592 65.811,56.21 ; R40.2 57.453,36.957 57.009,36.512 ; U4.8 70.223,56.21 ; 79.4,35.306 80.913,33.793 R39.2 ; 79.4,43.663 80.913,45.175 R35.2 80.913,48.463 ; 81.23,52.07 80.913,51.752 80.913,48.463 ; 85.496,52.07 94.643,42.923 R34.2 ; 70.223,56.21 70.223,56.085 70.885,55.423 ; 70.223,56.21 70.555,56.21 70.885,55.88 70.885,55.423 ; 70.885,55.423 C19.2 70.885,52.144 70.684,51.943 C18.2 70.684,49.454 71.649,48.489 80.888,48.489 80.913,48.463
  Bottom Layer w0.2: 63.068,9.818 63.068,13.449
  Bottom Layer w0.254: C7.1@49.249,15.164 50.978,15.164 54.521,18.707
  Bottom Layer w0.3: 38.659,15.771 38.659,18.796
  Bottom Layer w0.6: 40.654,21.253 v1(40.654,27.675)
  Bottom Layer w0.8: v1(8.026,18.11) v1(21.068,31.152) ; v1(21.068,27.675) v1(40.654,27.675) ; U2.7-8 38.125,14.752 38.325,14.552 C3.1 ; 38.659,15.771 C3.1 ; 38.659,18.796 39.435,19.572 R7.2 40.335,20.934 40.654,21.253 ; C7.1@49.249,15.164 48.637,14.552 C7.1 C6.1 44.352,14.552 44.299,14.499 C4.1 41.353,14.499 41.3,14.552 C3.1 ; 54.521,18.707 v1(54.521,20.256) ; 63.068,9.818 R1.1 ; 63.068,13.449 63.563,13.945 v1(64.795,13.945)
GND: C1.2 C2.1 C3.2 C4.2 C5.1 C6.2 C7.2 C8.1 C9.1 C10.1 C11.1 C12.1 C13.1 C14.2 C15.1 C16.1 C17.1 C18.1 C19.1 CR1.2 J1.2 J2.A1_B12 J2.B1_A12 J2.SH1 J2.SH2 J2.SH3 J2.SH4 J3.1 J3.8 J4.6 J4.S1 J4.S2 J4.S3 J4.S4 Q1.2 R2.1 R3.1 R4.2 R5.2 R6.2 R8.2 R12.1 R13.2 R18.1 R31.2 S1.2 S2.1 S3.1 S4.1 S5.1 S6.1 S7.1 S8.1 S9.1 S10.1 S11.1 SW1.4 SW2.3 U1.4 U1.8 U1.17 U2.4 U2.10 U2.15 U3.1 U3.40 U3.41 U3.42 U3.43 U3.44 U3.45 U3.46 U3.47 U3.48 U3.49 U4.3 U4.11 U4.15 U4.17 | length 8.7
  Top Layer w0.254: U3.43 U3.41 ; U3.46 U3.47 ; U4.3 69.223,58.208 U4.17 ; U4.15 69.223,58.708 U4.17 ; U4.11 69.723,58.708 U4.17
  Top Layer w0.3: J2.SH1 J2.A1_B12
  other v2: 38.989,9.271
NetC11_2: C11.2 U2.3 | length 4.9
  Bottom Layer w0.2: C11.2 35.385,20.285 35.426,20.244 U2.3
NetC12_2: C12.2 R14.1 SW2.2 U3.3 | length 52.4
  Top Layer w0.2: R14.1 20.447,60.071 20.472,60.096 20.472,61.238 20.501,61.267 20.501,62.23 21.009,62.738 C12.2 25.252,65.839 U3.3 28.956,65.839 29.337,65.458 29.337,54.051 26.772,51.486 26.772,48.552 29.134,46.19 29.134,40.322 29.451,40.005 33.591,40.005 33.909,40.322 33.909,45.521 SW2.2
NetCR1_1: CR1.1 J2.A6 J2.B6 | length 5.1
  Top Layer w0.2: J2.A6 49.75,3.937 49.775,3.912 50.725,3.912 50.75,3.937 J2.B6 50.75,5.715 51.097,6.062 CR1.1
NetCR1_3: CR1.3 J2.A7 J2.B7 | length 38.7
  Top Layer w0.2: J2.A7 50.25,5.563 50.225,5.588 49.275,5.588 49.25,5.563 J2.B7 49.25,3.011 49.593,2.667 55.944,2.667 56.337,3.061 56.337,14.694 53.099,17.932 51.511,17.932 51.105,17.526 51.105,8.951 CR1.3
NetCR1_4: CR1.4 R16.2 | length 62.3
  Top Layer w0.2: R16.2 21.477,50.989 22.053,50.413 22.053,46.807 25.248,43.612 25.248,34.739 49.806,10.18 49.806,6.854 49.454,6.502 47.65,6.502 47.625,6.528 47.625,8.926 47.65,8.951 CR1.4
NetCR1_6: CR1.6 R17.2 | length 54.9
  Top Layer w0.2: R17.2 21.223,45.477 23.952,42.748 23.952,35.308 49.456,9.804 49.456,7.409 49.098,7.051 CR1.6
NetJ2_A5: J2.A5 R12.2 | length 15.7
  Top Layer w0.2: R12.2 45.579,8.307 45.225,8.661 43.002,8.636 43.002,4.851 45.187,2.667 48.323,2.667 48.75,3.094 J2.A5
NetJ2_B5: J2.B5 R13.1 | length 4.3
  Top Layer w0.2: J2.B5 51.75,5.944 52.588,6.782 53.749,6.807 R13.1
NetJ3_2: J3.2 U3.11 | length 44.9
  Top Layer w0.2: U3.11 26.431,55.679 v1(26.873,56.121) ; J3.2 57.007,61.036 57.032,61.011 58.115,61.011 58.141,61.036 v1(58.141,62.154)
  Bottom Layer w0.2: v1(26.873,56.121) 36.805,56.121 36.881,56.197 36.881,60.642 36.411,61.112 35.623,61.112 35.306,61.43 35.306,62.31 35.458,62.463 57.832,62.463 v1(58.141,62.154)
NetJ3_4: J3.4 U3.10 | length 50.4
  Top Layer w0.2: v1(24.13,55.08) 24.13,56.25 24.828,56.949 U3.10 ; J3.4 56.007,59.055 56.413,58.649 60.389,58.649 60.706,58.331 v1(60.706,55.702)
  Bottom Layer w0.2: v1(24.13,55.08) 60.084,55.08 v1(60.706,55.702)
NetJ3_5: J3.5 R24.1 U3.18 | length 45.7
  Top Layer w0.2: U3.18 31.242,48.895 32.214,47.923 38.322,47.923 38.659,48.26 v1(38.659,48.908) ; J3.5 55.507,58.318 55.532,58.293 59.436,58.293 59.776,57.953 R24.1 59.776,53.797 58.928,53.797 v1(58.75,53.619)
  Bottom Layer w0.2: v1(38.659,48.908) 43.37,53.619 v1(58.75,53.619)
NetJ3_11: J3.11 R23.1 | length 8.5
  Top Layer w0.3: J3.11 52.507,57.612 54.188,55.931 R23.1
NetJ3_12: J3.12 R22.1 | length 7.7
  Top Layer w0.3: R22.1 51.902,56.134 52.007,56.239 J3.12
NetJ3_13: J3.13 R21.1 | length 8.4
  Top Layer w0.3: R21.1 49.743,58.993 51.507,60.757 J3.13
NetJ3_14: J3.14 R20.1 | length 9.3
  Top Layer w0.3: R20.1 47.33,57.283 51.007,60.96 J3.14
NetJ4_1: J4.1 R25.2 | length 22.7
  Top Layer w0.2: R25.2 1.397,53.086 1.346,53.137 1.346,55.601 2.87,57.125 2.87,63.563 3.238,63.932 9.244,63.932 10.058,63.117 J4.1
NetJ4_2: J4.2 R28.1 U3.22 | length 67.2
  Top Layer w0.2: v1(4.064,47.015) R28.1 ; J4.2 v1(15.418,62.017) ; U3.22 v1(36.322,60.414)
  Bottom Layer w0.2: v1(4.064,47.015) 4.064,54.292 4.508,54.737 6.934,54.737 14.214,62.017 v1(15.418,62.017) 18.425,65.024 26.67,65.024 28.194,63.5 28.194,59.182 29.972,57.404 34.417,57.404 36.322,59.309 v1(36.322,60.414)
NetJ4_8: J4.8 R26.2 | length 24.1
  Top Layer w0.2: J4.8 11.128,55.417 10.902,55.191 7.457,55.191 6.978,54.712 3.886,54.712 3.327,55.27 1.727,55.27 1.702,55.245 1.702,53.315 2.286,52.73 10.287,52.73 11.43,51.587 11.43,50.786 R26.2
NetJ5_1: J5.1 U4.9 | length 3.7
  Top Layer w0.4: U4.9 71.033,57.708 71.795,56.946
  Top Layer w0.5: 71.795,56.946 J5.1
NetJ5_2: J5.2 U4.10 | length 4.2
  Top Layer w0.2: 71.357,58.208 72.009,57.556 72.871,57.556
  Top Layer w0.254: U4.10 71.357,58.208
  Top Layer w0.3: 72.871,57.556 J5.2
NetL1_1: L1.1 U2.11 | length 4
  Bottom Layer w0.3: 34.676,12.294 U2.11
  Bottom Layer w0.8: L1.1 34.079,12.268 34.651,12.268 34.676,12.294
NetL1_2: L1.2 U2.9 | length 3.8
  Bottom Layer w0.3: U2.9 35.676,13.652 36.449,12.88
  Bottom Layer w0.8: L1.2 36.449,12.88
NetQ1_1: Q1.1 R18.2 R19.2 | length 4.4
  Top Layer w0.2: Q1.1 55.118,47.121 R19.2 56.312,45.96 56.439,45.833 R18.2
NetQ1_3: Q1.3 R20.2 R21.2 R22.2 R23.2 | length 11
  Top Layer w0.2: R23.2 54.188,51.298 55.518,49.968 Q1.3
  Top Layer w0.3: R20.2 48.477,52.465 48.618,52.606 R21.2 R22.2 52.956,52.606 53.097,52.465 R23.2
NetR2_2: R2.2 U1.6 U3.34 | length 65.2
  Top Layer w0.2: U3.34 44.893,60.759 45.847,59.805 45.847,50.063 47.473,48.438 47.473,26.095 60.207,13.36 v1(66.929,13.36)
  Bottom Layer w0.2: R2.2 v1@66.929,13.106 ; v1(66.929,13.36) v1@66.929,13.106 ; U1.6 67.039,13.217 v1@66.929,13.106
NetR3_2: R3.2 U1.5 U3.25 | length 67.2
  Top Layer w0.2: U3.25 40.132,49.798 41.453,48.477 v1(41.453,32.156) ; v1(69.393,14.122) v1(69.393,24.638)
  Bottom Layer w0.2: v1(41.453,32.156) 48.971,24.638 v1(69.393,24.638) ; U1.5 67.539,13.335 68.072,12.802 ; v1(69.393,14.122) 68.072,12.802 ; R3.2 69.204,11.67 68.072,12.802
NetR4_1: R4.1 U1.12 | length 6.8
  Bottom Layer w0.2: R4.1 59.919,16.877 60.438,16.358 63.17,16.358 63.577,16.765 U1.12
NetR5_1: R5.1 U1.1 | length 3.8
  Bottom Layer w0.2: U1.1 68.809,16.765 68.834,16.79 R5.1
NetR6_1: R6.1 U1.16 | length 3.6
  Bottom Layer w0.2: R6.1 67.056,19.967 67.539,19.484 U1.16
NetR7_1: R7.1 R8.1 U2.5 | length 9.4
  Bottom Layer w0.2: U2.5 37.123,16.002 37.149,16.027 R8.1 37.149,21.768 39.359,21.793 R7.1
NetR9_2: R9.2 S1.1 U3.8 | length 68.5
  Top Layer w0.2: U3.8 22.377,59.489 21.895,59.006 21.895,54.432 20.041,52.578 20.041,44.094 23.012,41.123 23.012,21.628 26.187,18.453 26.187,9.957 24.624,8.393 R9.2 26.365,2.159 26.492,2.286 S1.1
NetR10_2: R10.2 U2.14 | length 11.5
  Bottom Layer w0.2: R10.2 29.718,19.329 27.915,17.526 27.915,15.875 28.288,15.502 U2.14
NetR11_2: R11.2 U2.1 | length 6.4
  Bottom Layer w0.2: R11.2 32.817,20.701 33.198,20.32 33.198,16.828 33.617,16.408 34.426,16.408 U2.1
NetR15_1: R15.1 SW1.1 U3.27 | length 14.2
  Top Layer w0.2: U3.27 44.905,51.869 45.339,51.435 45.339,47.942 45.657,47.625 R15.1 46.623,45.441 SW1.1
NetR16_1: R16.1 U3.13 | length 2.9
  Top Layer w0.2: R16.1 23.825,51.943 25.021,53.139 U3.13
NetR17_1: R17.1 U3.14 | length 4.7
  Top Layer w0.2: R17.1 24.105,49.403 v1(24.257,49.555) ; v1(24.257,51.183) 24.943,51.869 U3.14
  Bottom Layer w0.2: v1(24.257,49.555) v1(24.257,51.183)
NetR19_1: R19.1 U3.23 | length 23.9
  Top Layer w0.2: U3.23 37.592,49.911 38.176,49.911 38.202,49.886 38.202,49.632 38.227,49.606 38.919,49.606 39.256,49.27 v1(39.256,47.32) ; v1(54.839,42.901) 55.118,43.18 R19.1
  Bottom Layer w0.2: v1(39.256,47.32) 40.64,47.32 40.996,47.676 50.063,47.676 v1(54.839,42.901)
NetR30_1: R30.1 U4.4 | length 12
  Top Layer w0.2: U4.4 67.386,57.708 67.154,57.94 67.154,62.023 69.838,64.707 R30.1
NetR30_2: R30.2 R31.1 U3.36 | length 31.1
  Top Layer w0.2: U3.36 43.473,63.605 43.912,63.605 43.933,63.627 60.427,63.627 63.257,66.457 R31.1 R30.2
NetR32_1: R32.1 S2.2 U3.39 | length 61.7
  Top Layer w0.2: S2.2@17.176,33.277 S2.2@19.325,33.3 ; S2.2@17.209,32.077 19.068,32.077 S2.2@19.232,31.913 ; S2.2@17.377,34.477 18.777,34.477 S2.2@18.777,34.514 ; S2.2@17.725,30.797 18.234,30.797 18.425,30.877 18.549,31.001 18.577,31.001 18.577,31.2 18.779,31.2 18.956,31.2 18.956,31.42 19.108,31.42 19.108,31.659 19.232,31.782 S2.2@19.232,31.913 ; S2.2@18.112,35.077 18.288,35.077 18.353,35.143 18.353,34.929 18.528,34.754 18.576,34.754 18.777,34.754 S2.2@18.777,34.556 ; v1(18.504,42.888) 18.504,37.236 R32.1 19.318,35.096 S2.2@18.777,34.556 ; S2.2@19.389,33.299 19.421,33.299 19.421,33.019 S2.2@19.421,32.736 ; S2.2@19.389,33.3 S2.2@19.325,33.3 ; v1(35.763,51.867) 35.763,60.668 42.204,67.109 U3.39 ; S2.2@18.777,34.514 S2.2@18.777,34.556 ; S2.2@18.777,34.514 18.955,34.336 18.955,34.188 19.016,34.188 19.107,34.097 19.107,33.967 19.231,33.843 19.231,33.67 19.325,33.576 S2.2@19.325,33.3 ; S2.2@19.232,31.913 19.326,31.913 19.326,32.18 19.389,32.18 19.389,32.455 19.389,32.705 S2.2@19.41,32.726 ; S2.2@19.41,32.726 S2.2@19.421,32.736 ; S2.2@19.41,32.726 19.421,32.715 S2.2@19.421,32.736
  Bottom Layer w0.2: v1(18.504,42.888) 20.549,44.933 28.829,44.933 v1(35.763,51.867)
NetR33_1: R33.1 S3.2 U3.4 | length 86.6
  Top Layer w0.2: v1(5.029,15.824) 7.95,15.824 8.876,16.75 R33.1 8.876,19.228 8.975,19.327 8.975,21.797 9.514,21.797 9.675,21.877 9.675,22.001 9.827,22.001 10.029,22.001 10.029,22.2 10.206,22.2 10.206,22.42 10.358,22.42 10.358,22.659 10.482,22.782 S3.2@10.482,22.913 ; S3.2@8.426,24.277 10.639,24.277 S3.2@10.639,24.282 ; S3.2@8.459,23.077 10.482,23.077 S3.2@10.482,22.913 ; S3.2@8.627,25.477 10.028,25.477 S3.2@10.028,25.556 ; S3.2@9.362,26.077 9.455,26.077 9.603,25.929 9.778,25.754 9.826,25.754 9.826,25.556 S3.2@10.028,25.556 ; S3.2@10.671,23.737 S3.2@10.671,23.724 ; v1(24.028,60.96) 24.028,63.604 24.994,64.569 U3.4 ; S3.2@10.028,25.556 10.205,25.378 10.205,25.336 10.357,25.336 10.357,25.097 10.481,24.973 10.481,24.843 10.575,24.843 10.575,24.576 10.639,24.512 10.639,24.3 S3.2@10.639,24.282 ; S3.2@10.482,22.913 10.576,22.913 10.576,23.18 10.639,23.18 10.639,23.455 10.671,23.455 S3.2@10.671,23.724 ; S3.2@10.639,24.282 10.671,24.282 10.671,24.019 S3.2@10.671,23.724
  Bottom Layer w0.2: v1(5.029,15.824) 5.029,53.797 5.461,54.229 7.645,54.229 14.376,60.96 v1(24.028,60.96)
NetR34_1: R34.1 S4.2 U3.6 | length 104.6
  Top Layer w0.2: U3.6 28.095,62.029 v1(28.753,62.687) ; S4.2@96.061,30.146 98.274,30.146 S4.2@98.274,30.15 ; S4.2@96.094,28.946 97.953,28.946 S4.2@98.117,28.782 ; S4.2@96.262,31.346 96.262,31.624 96.584,31.946 S4.2@96.997,31.946 ; v1(96.393,46.177) R34.1 96.393,32.55 S4.2@96.997,31.946 ; S4.2@96.61,27.666 97.14,27.666 97.31,27.746 97.462,27.746 97.462,27.87 97.462,28.069 97.664,28.069 97.765,28.069 97.765,28.212 97.841,28.289 97.841,28.528 97.993,28.528 98.117,28.651 S4.2@98.117,28.782 ; S4.2@96.997,31.946 97.173,31.946 97.238,32.011 97.238,31.798 97.413,31.623 97.461,31.623 97.662,31.623 97.662,31.425 97.84,31.247 97.84,31.205 97.992,30.966 98.044,30.966 98.044,30.784 98.116,30.712 98.116,30.445 98.21,30.445 98.21,30.233 98.274,30.169 S4.2@98.274,30.15 ; S4.2@98.117,28.782 98.211,28.782 98.211,29.049 98.211,29.261 98.274,29.324 98.306,29.324 98.306,29.606 98.306,29.888 98.306,30.15 S4.2@98.274,30.15
  Bottom Layer w0.2: v1(28.753,62.687) 28.878,62.813 79.758,62.813 v1(96.393,46.177)
NetR35_1: R35.1 S5.2 U3.12 | length 81.1
  Top Layer w0.2: U3.12 27.016,54.409 27.754,53.67 27.813,53.67 v1(28.651,54.508) ; S5.2@82.561,40.646 S5.2@84.71,40.669 ; S5.2@82.594,39.446 84.453,39.446 S5.2@84.617,39.282 ; v1(82.663,51.511) R35.1 82.663,44.778 82.762,44.679 82.762,41.846 84.162,41.846 S5.2@84.162,41.883 ; S5.2@83.11,38.166 83.608,38.166 83.81,38.246 83.962,38.246 83.962,38.37 83.962,38.481 84.076,38.481 84.164,38.569 84.252,38.569 84.252,38.699 84.341,38.789 84.341,39.028 84.493,39.028 84.617,39.151 S5.2@84.617,39.282 ; S5.2@83.497,42.446 83.67,42.446 83.63,42.406 83.738,42.298 83.961,42.298 83.961,42.123 84.162,42.123 84.162,41.925 S5.2@84.162,41.883 ; S5.2@84.162,41.883 84.34,41.705 84.34,41.466 84.492,41.466 84.616,41.342 84.616,41.212 84.616,41.039 84.71,40.945 S5.2@84.71,40.669 ; S5.2@84.617,39.282 84.711,39.282 84.711,39.549 84.711,39.824 84.774,39.824 84.806,39.824 84.806,40.106 84.806,40.388 84.806,40.665 84.774,40.665 84.774,40.669 S5.2@84.71,40.669
  Bottom Layer w0.2: v1(28.651,54.508) 28.702,54.559 79.615,54.559 v1(82.663,51.511)
NetR36_1: R36.1 S6.2 U3.35 | length 52.6
  Top Layer w0.2: S6.2@42.501,23.034 44.602,23.034 44.602,23.285 S6.2@44.65,23.333 ; S6.2@42.534,21.834 S6.2@44.557,21.834 ; S6.2@43.05,20.554 43.572,20.554 43.75,20.634 43.902,20.634 43.902,20.758 43.902,20.957 44.104,20.957 44.196,21.049 44.196,21.091 44.281,21.177 44.281,21.416 44.433,21.416 44.557,21.539 44.557,21.67 S6.2@44.557,21.834 ; U3.35 41.912,62.029 41.478,61.595 41.478,55.093 42.062,54.508 42.062,30.099 R36.1 42.404,27.878 42.723,27.559 S6.2@42.723,24.236 ; S6.2@43.437,24.834 43.605,24.834 43.678,24.908 43.678,24.686 43.853,24.511 43.901,24.511 S6.2@44.036,24.376 ; S6.2@42.723,24.236 43.917,24.363 S6.2@44.036,24.376 ; S6.2@42.723,24.236 42.702,24.234 42.723,24.234 S6.2@42.723,24.236 ; S6.2@44.036,24.376 S6.2@44.101,24.311 ; S6.2@44.036,24.376 44.095,24.382 44.102,24.313 S6.2@44.101,24.311 ; S6.2@44.101,24.311 44.081,24.292 44.28,24.093 44.28,23.854 44.432,23.854 44.556,23.73 44.556,23.6 44.556,23.427 S6.2@44.65,23.333 ; S6.2@44.557,21.834 44.557,21.843 44.651,21.937 44.651,21.92 44.714,21.92 44.714,22.212 44.714,22.494 44.746,22.494 44.755,22.502 44.755,22.767 44.746,22.776 44.746,23.038 44.714,23.038 44.714,23.057 44.65,23.057 S6.2@44.65,23.333
NetR37_1: R37.1 S7.2 U3.38 | length 83.2
  Top Layer w0.2: R37.1 17.131,13.047 17.725,13.047 18.251,13.047 18.425,13.127 18.425,13.251 18.577,13.251 18.577,13.45 18.779,13.45 18.956,13.45 18.956,13.67 19.108,13.67 19.108,13.909 19.232,14.032 S7.2@19.232,14.163 ; S7.2@17.176,15.527 S7.2@19.389,15.527 ; S7.2@17.209,14.327 19.232,14.327 S7.2@19.232,14.163 ; S7.2@17.377,16.727 18.777,16.727 S7.2@18.777,16.764 ; v1(20.168,41.453) 20.168,19.382 18.112,17.327 18.292,17.327 18.353,17.388 18.353,17.179 18.528,17.004 18.576,17.004 18.777,17.004 18.777,16.806 S7.2@18.777,16.764 ; v1(40.208,52.197) 40.208,63.754 42.293,65.839 U3.38 ; S7.2@18.777,16.764 18.955,16.586 19.107,16.586 19.107,16.347 19.231,16.223 19.231,16.093 19.325,16.093 19.325,15.826 19.389,15.826 19.389,15.55 S7.2@19.389,15.527 ; S7.2@19.232,14.163 19.326,14.163 19.326,14.43 19.389,14.43 19.389,14.705 19.421,14.705 19.421,14.987 19.421,15.269 19.389,15.269 S7.2@19.389,15.527
  Bottom Layer w0.2: v1(20.168,41.453) 22.708,43.993 28.6,43.993 34.468,49.86 37.871,49.86 v1(40.208,52.197)
NetR38_1: R38.1 S8.2 U3.5 | length 64.9
  Top Layer w0.2: v1(20.625,46.406) 20.625,44.882 23.47,42.037 23.47,29.72 27.112,26.077 27.296,26.077 27.353,26.134 27.353,25.929 27.528,25.754 27.576,25.754 27.576,25.556 S8.2@27.777,25.556 ; v1(22.301,16.891) 22.555,17.145 R38.1 ; U3.5 26.543,63.299 26.901,62.941 v1(26.901,62.791) ; S8.2@26.176,24.277 28.389,24.277 S8.2@28.389,24.282 ; S8.2@26.209,23.077 28.232,23.077 S8.2@28.232,22.913 ; S8.2@26.377,25.477 27.777,25.477 S8.2@27.777,25.556 ; v1(26.543,20.726) 26.543,21.797 26.725,21.797 27.217,21.797 27.374,21.641 27.425,21.692 27.425,21.877 27.425,22.001 27.577,22.001 27.577,22.2 27.779,22.2 27.956,22.2 27.956,22.42 28.108,22.42 28.108,22.659 28.232,22.782 S8.2@28.232,22.913 ; S8.2@27.777,25.556 27.955,25.378 27.955,25.336 27.955,25.097 28.107,25.097 28.107,24.967 28.231,24.843 28.231,24.576 28.325,24.576 28.325,24.3 28.389,24.3 S8.2@28.389,24.282 ; S8.2@28.232,22.913 28.326,22.913 28.326,23.18 28.389,23.18 28.389,23.455 28.421,23.455 28.421,23.737 28.421,24.019 28.421,24.282 S8.2@28.389,24.282
  Bottom Layer w0.2: v1(20.625,46.406) 20.625,56.515 v1(26.901,62.791) ; v1(22.301,16.891) 22.479,16.713 22.53,16.713 v1(26.543,20.726)
NetR39_1: R39.1 S9.2 U3.7 | length 98.1
  Top Layer w0.2: U3.7 27.028,60.759 27.457,60.329 27.457,54.762 v1(27.737,54.483) ; S9.2@82.561,19.646 S9.2@84.774,19.646 ; S9.2@82.594,18.446 84.453,18.446 S9.2@84.617,18.282 ; v1(82.663,34.442) R39.1 82.663,24.102 82.762,24.003 82.762,20.846 84.162,20.846 S9.2@84.162,20.883 ; S9.2@83.11,17.166 83.661,17.166 83.81,17.246 83.962,17.246 83.962,17.37 83.962,17.475 84.07,17.475 84.164,17.569 84.252,17.569 84.252,17.699 84.341,17.789 84.341,18.028 84.493,18.028 84.617,18.151 S9.2@84.617,18.282 ; S9.2@83.497,21.446 83.676,21.446 83.738,21.508 83.738,21.298 83.961,21.298 83.961,21.123 84.162,21.123 84.162,20.925 S9.2@84.162,20.883 ; S9.2@84.162,20.883 84.34,20.705 84.492,20.705 84.492,20.466 84.681,20.277 84.616,20.212 84.616,19.945 84.71,19.945 84.774,19.945 84.774,19.669 S9.2@84.774,19.646 ; S9.2@84.617,18.282 84.711,18.282 84.711,18.549 84.711,18.824 84.774,18.824 84.806,18.824 84.806,19.106 84.806,19.388 84.774,19.388 S9.2@84.774,19.646
  Bottom Layer w0.2: v1(27.737,54.483) 28.778,53.442 29.557,54.169 62.936,54.169 v1(82.663,34.442)
NetR40_1: R40.1 S10.2 U3.17 | length 69.1
  Top Layer w0.2: v1(29.972,40.564) U3.17 ; v1(68.453,38.049) 68.806,37.696 R40.1 68.806,35.004 69.266,34.544 S10.2@69.266,31.346 ; S10.2@69.061,30.146 71.274,30.146 S10.2@71.274,30.15 ; S10.2@69.094,28.946 70.953,28.946 S10.2@71.117,28.782 ; S10.2@69.262,31.346 S10.2@69.266,31.346 ; S10.2@69.61,27.666 70.14,27.666 70.31,27.746 70.462,27.746 70.462,27.87 70.462,28.069 70.664,28.069 70.764,28.069 70.764,28.212 70.841,28.289 70.841,28.528 70.993,28.528 71.117,28.651 S10.2@71.117,28.782 ; S10.2@69.997,31.946 70.173,31.946 70.238,32.011 70.238,31.798 70.413,31.623 70.461,31.623 70.662,31.623 S10.2@70.662,31.425 ; S10.2@69.266,31.346 70.584,31.346 S10.2@70.662,31.425 ; S10.2@70.662,31.425 70.84,31.247 70.84,31.205 70.992,30.966 71.044,30.966 71.044,30.784 71.116,30.712 71.116,30.445 71.21,30.445 71.21,30.233 71.274,30.169 S10.2@71.274,30.15 ; S10.2@71.117,28.782 71.211,28.782 71.211,29.049 71.211,29.261 71.274,29.324 71.306,29.356 71.306,29.606 71.306,29.888 71.306,30.15 S10.2@71.274,30.15
  Bottom Layer w0.2: v1(29.972,40.564) 32.487,38.049 v1(68.453,38.049)
NetR41_1: R41.1 S11.2 U3.24 | length 75.9
  Top Layer w0.2: U3.24 38.862,50.038 39.45,50.038 39.476,49.632 39.923,49.184 39.923,47.035 39.56,46.672 38.645,46.672 37.744,47.573 36.258,47.573 35.738,47.052 35.738,38.786 v1(39.065,35.458) ; R41.1 55.259,29.769 55.905,29.769 58.217,27.457 S11.2@58.217,24.234 ; S11.2@58.001,23.034 60.224,23.034 S11.2@60.246,23.012 ; S11.2@58.034,21.834 S11.2@60.057,21.834 ; S11.2@58.202,24.234 S11.2@58.217,24.234 ; S11.2@58.55,20.554 58.872,20.554 58.881,20.545 59.161,20.545 59.25,20.634 59.402,20.634 59.402,20.758 59.604,20.758 59.604,20.957 59.604,21.177 59.781,21.177 59.933,21.177 59.933,21.416 60.057,21.539 60.057,21.67 S11.2@60.057,21.834 ; v1(58.903,35.458) 58.903,24.92 S11.2@58.217,24.234 ; S11.2@58.937,24.834 58.937,24.686 59.178,24.686 S11.2@59.401,24.463 ; S11.2@58.217,24.234 59.401,24.234 S11.2@59.401,24.463 ; S11.2@59.401,24.463 59.776,24.088 S11.2@59.78,24.084 ; S11.2@59.401,24.463 59.401,24.511 59.603,24.511 59.603,24.313 59.78,24.135 59.78,24.093 S11.2@59.78,24.084 ; S11.2@59.78,24.084 59.78,23.854 59.932,23.854 59.995,23.854 59.995,23.661 S11.2@60.056,23.6 ; S11.2@59.78,24.084 60.056,23.808 S11.2@60.056,23.6 ; S11.2@60.056,23.6 60.056,23.333 60.15,23.333 60.15,23.057 60.214,23.057 60.214,23.038 60.246,23.038 S11.2@60.246,23.012 ; S11.2@60.057,21.834 60.057,21.843 60.151,21.937 60.151,21.92 60.214,21.92 60.214,22.212 60.214,22.462 60.246,22.494 60.246,22.213 60.477,22.445 60.477,22.545 60.246,22.776 S11.2@60.246,23.012
  Bottom Layer w0.2: v1(39.065,35.458) v1(58.903,35.458)
NetU3_31: U3.31 U4.16 | length 29.5
  Top Layer w0.2: U3.31 44.514,56.949 44.983,57.419 v1(44.983,59.258) ; v1(68.326,60.579) 68.723,60.35 U4.16
  Bottom Layer w0.2: v1(44.983,59.258) 45.333,59.608 55.507,59.608 55.857,59.258 68.008,59.258 68.326,59.576 v1(68.326,60.579)
NetU3_32: U3.32 U4.14 | length 36.2
  Top Layer w0.2: U3.32 44.295,58.219 v1(44.399,58.115) ; U4.14 69.723,60.452 70.428,61.157 70.923,61.157 72.415,59.665 v1(72.415,58.115)
  Bottom Layer w0.2: v1(44.399,58.115) 45.872,56.642 70.942,56.642 v1(72.415,58.115)
NetU3_33: U3.33 U4.1 | length 28
  Top Layer w0.2: v1(42.037,59.893) 42.441,59.489 U3.33 ; v1(67.704,59.893) 67.704,59.208 U4.1
  Bottom Layer w0.2: v1(42.037,59.893) 42.102,59.958 55.857,59.958 55.922,59.893 v1(67.704,59.893)
SPI_MISO: J3.7 J4.7 R27.1 U3.21 | length 76.2
  Top Layer w0.2: R27.1 v1(10.262,50.772) v1@10.259,50.775 ; v1(10.338,55.753) 11.102,56.517 J4.7 ; v1(28.016,51.816) 34.671,51.816 35.052,51.435 ; U3.21 35.052,51.435 ; v1(36.017,61.912) 35.052,60.947 35.052,51.435 ; v1(54.507,60.682) J3.7
  Bottom Layer w0.2: v1(10.338,55.753) 10.109,55.753 7.468,53.111 6.413,53.111 6.045,52.743 6.045,51.625 6.896,50.775 10.259,50.775 v1(10.262,50.772) 15.618,45.415 22.286,45.415 28.016,51.146 v1(28.016,51.816) ; v1(36.017,61.912) 36.335,61.595 53.594,61.595 v1(54.507,60.682)
SPI_MOSI: J3.6 J4.3 R29.1 U3.19 | length 98
  Top Layer w0.2: R29.1 v1(6.604,51.867) ; J4.3 15.308,60.917 v1(15.875,60.35) ; v1(31.801,49.124) 32.512,49.835 U3.19 ; v1(54.94,58.877) 55.118,59.055 55.118,60.976 55.007,61.087 J3.6
  Bottom Layer w0.2: v1(6.604,51.867) 10.363,51.867 16.383,45.847 20.041,45.847 ; v1(15.875,60.35) 15.875,50.013 20.041,45.847 ; v1(31.801,49.124) 28.55,52.375 25.463,52.375 ; v1(54.94,58.877) 54.762,58.699 39.954,58.699 36.741,55.486 26.276,55.486 25.883,55.88 23.889,55.88 23.571,55.562 23.571,52.705 23.901,52.375 25.463,52.375 ; 20.041,45.847 21.895,45.847 24.867,48.819 24.867,51.778 25.463,52.375
SPI_SCK: J3.3 J4.5 U3.20 | length 96
  Top Layer w0.2: J4.5 12.763,58.717 13.259,58.222 13.259,44.653 v1(17.247,40.665) ; U3.20 33.782,49.53 ; v1(34.353,48.59) 33.782,49.162 33.782,49.53 ; v1(37.77,49.162) 34.15,49.162 33.782,49.53 ; J3.3 56.507,60.96 58.437,59.03 61.023,59.03 61.443,58.61 v1(61.443,53.429)
  Bottom Layer w0.2: v1(17.247,40.665) 28.507,40.665 31.656,43.815 37.452,43.815 37.77,44.133 37.77,48.04 ; v1(34.353,48.59) 34.904,48.04 37.77,48.04 ; v1(37.77,49.162) 37.77,48.04 ; v1(61.443,53.429) 56.054,48.04 37.77,48.04
USB_POWER_GOOD_N: R1.2 U1.7 U3.9 | length 113.1
  Top Layer w0.2: U3.9 24.793,58.219 22.377,55.804 22.377,50.952 22.743,50.587 24.241,50.587 28.27,46.558 28.27,38.142 v1(33.683,32.729)
  Bottom Layer w0.2: v1(33.683,32.729) 68.287,32.729 76.2,24.816 76.2,9.525 75.768,9.093 65.938,9.093 65.913,9.119 65.913,11.098 65.468,11.543 R1.2 64.033,12.421 64.872,12.421 66.539,14.088 U1.7
VBAT: C5.2 J1.1 U1.2 U1.3 | length 9.1
  Bottom Layer w0.4: U1.2 U1.3 70.692,15.765
  Bottom Layer w0.5: 70.692,15.765 71.12,16.192
  Bottom Layer w0.8: 71.12,16.192 71.12,17.579 C5.2 73.101,17.579 73.44,17.24 J1.1
VBUS_V5: C1.1 CR1.5 J2.A4_B9 J2.B4_A9 U1.13 | length 56.7
  Top Layer w0.2: 48.922,8.18 49.105,8.364 49.105,8.454 49.106,9.408 48.989,9.525 ; 54.585,6.667 54.585,10.109
  Top Layer w0.254: 46.253,9.525 48.989,9.525
  Top Layer w0.3: 52.4,5.575 53.175,6.35 54.267,6.35
  Top Layer w0.4: 54.267,6.35 54.585,6.667
  Top Layer w0.5: CR1.5@48.546,8.18 48.922,8.18
  Top Layer w0.6: 46.838,6.35 47.6,5.588 J2.A4_B9 ; CR1.5 CR1.5@48.546,8.18 ; J2.B4_A9 52.4,5.575
  Top Layer w0.8: v1(42.393,13.386) 46.253,9.525 46.838,8.941 46.838,6.35 ; v1(52.984,15.824) 52.984,11.709 54.585,10.109
  Bottom Layer w0.3: 49.833,13.386 53.518,17.071 54.231,17.071
  Bottom Layer w0.4: 57.402,18.339 63.932,18.339 ; 64.795,17.475 66.039,17.475 U1.13
  Bottom Layer w0.6: v1(42.393,13.386) 49.833,13.386
  Bottom Layer w0.8: v1(52.984,15.824) 54.231,17.071 C1.1 57.402,18.339 ; 63.932,18.339 64.795,17.475
VSYS: C2.2 C8.2 C9.2 C10.2 R10.1 R11.1 U1.10 U1.11 U2.12-13 | length 70.1
  Bottom Layer w0.2: 27.559,14.16 27.559,21.907 ; 57.848,17.704 60.175,17.704 ; 58.166,15.977 59.868,15.977
  Bottom Layer w0.254: 57.328,16.192 57.328,17.183 57.81,17.666 ; 57.81,16.332 58.166,15.977